# Altium PCB IvcBoard.PcbDoc (part 1 of 3)
Units mil, origin at the board's own origin, x right, y up, seen from the top; angles counter-clockwise.
Board outline 2900 x 5000 mil, 4 copper layers (Top Layer, GND 3, GND 2, Bottom Layer), stack 53.912 mil thick; 217 components, 141 nets, 662 pads, 224 vias.
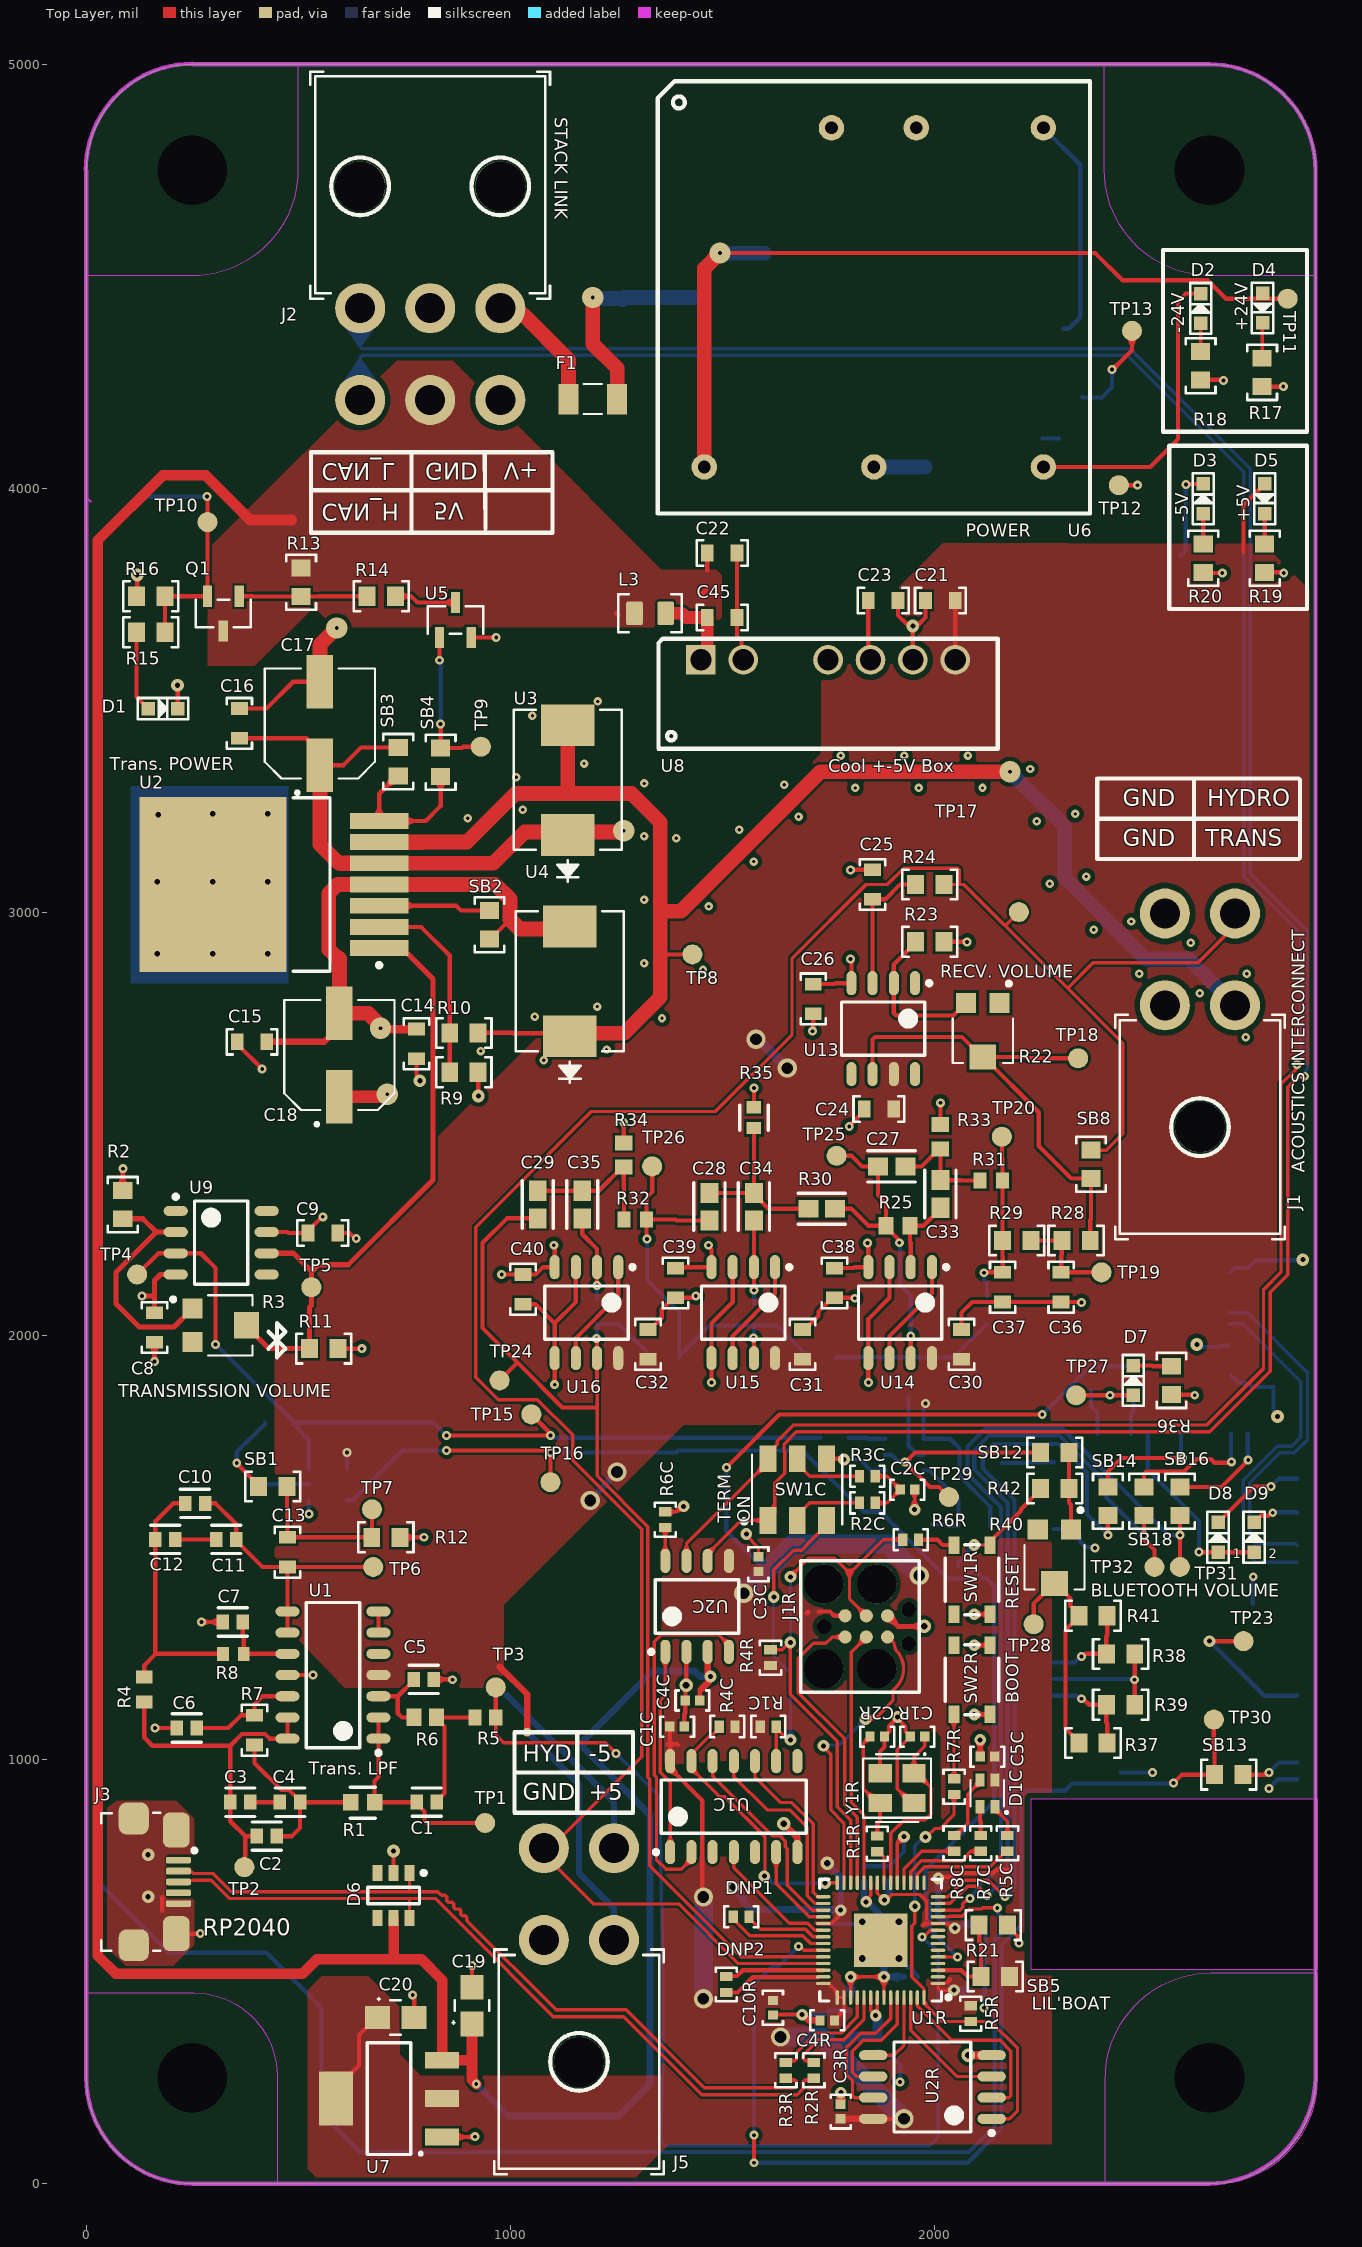
[diagram p0: Top Layer view]
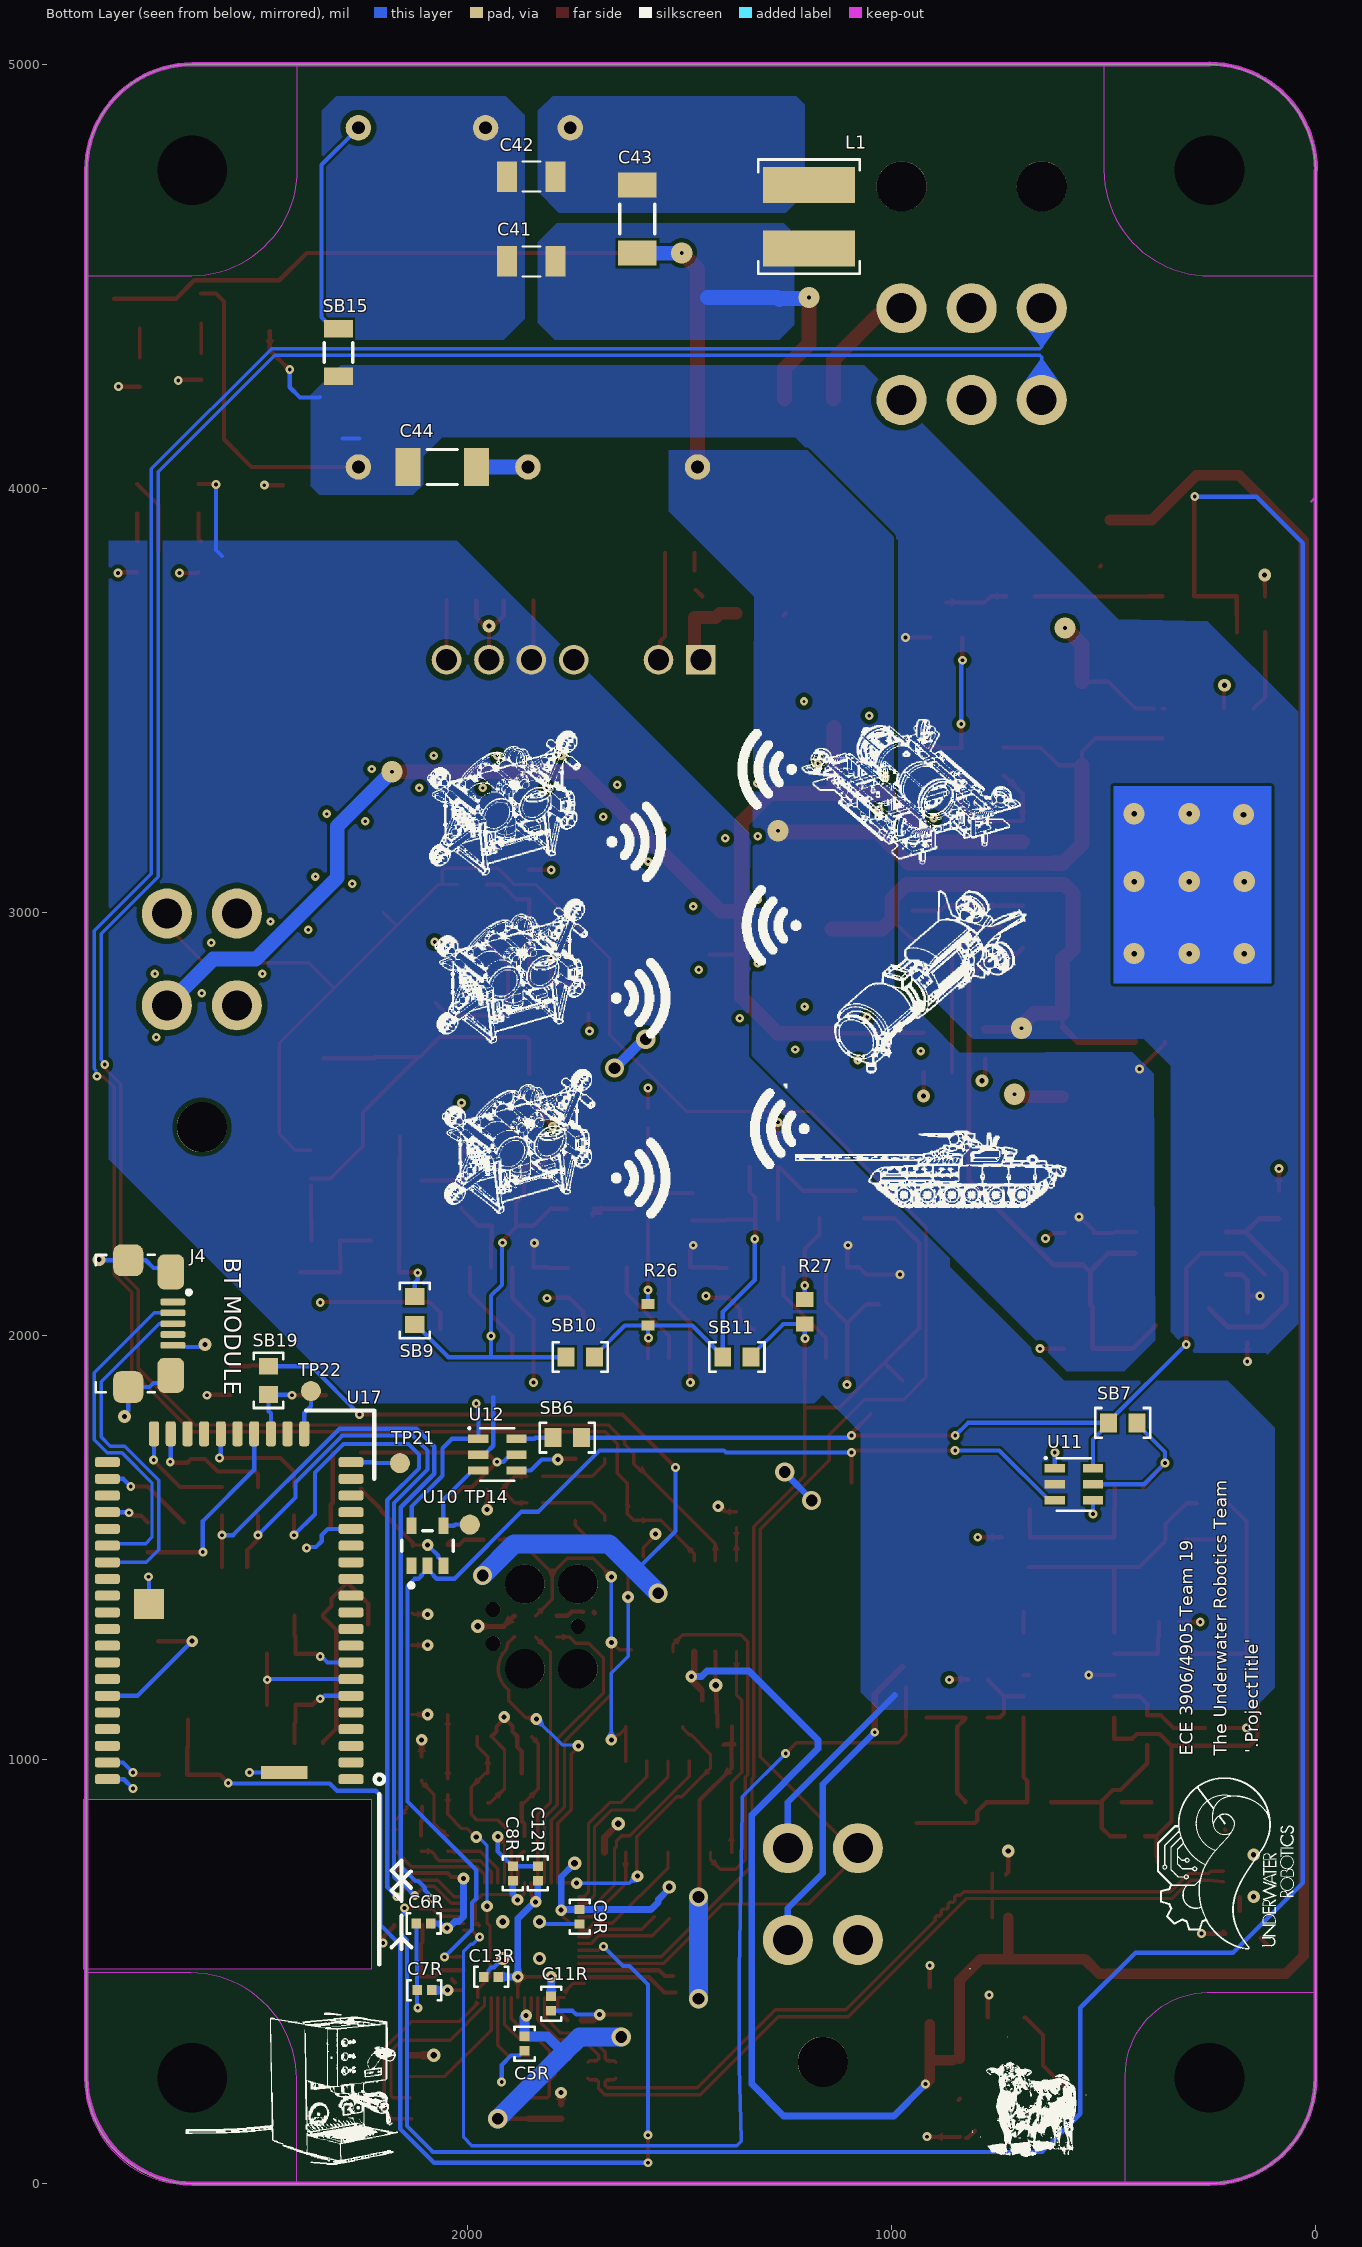
[diagram p1: Bottom Layer view, seen from below]
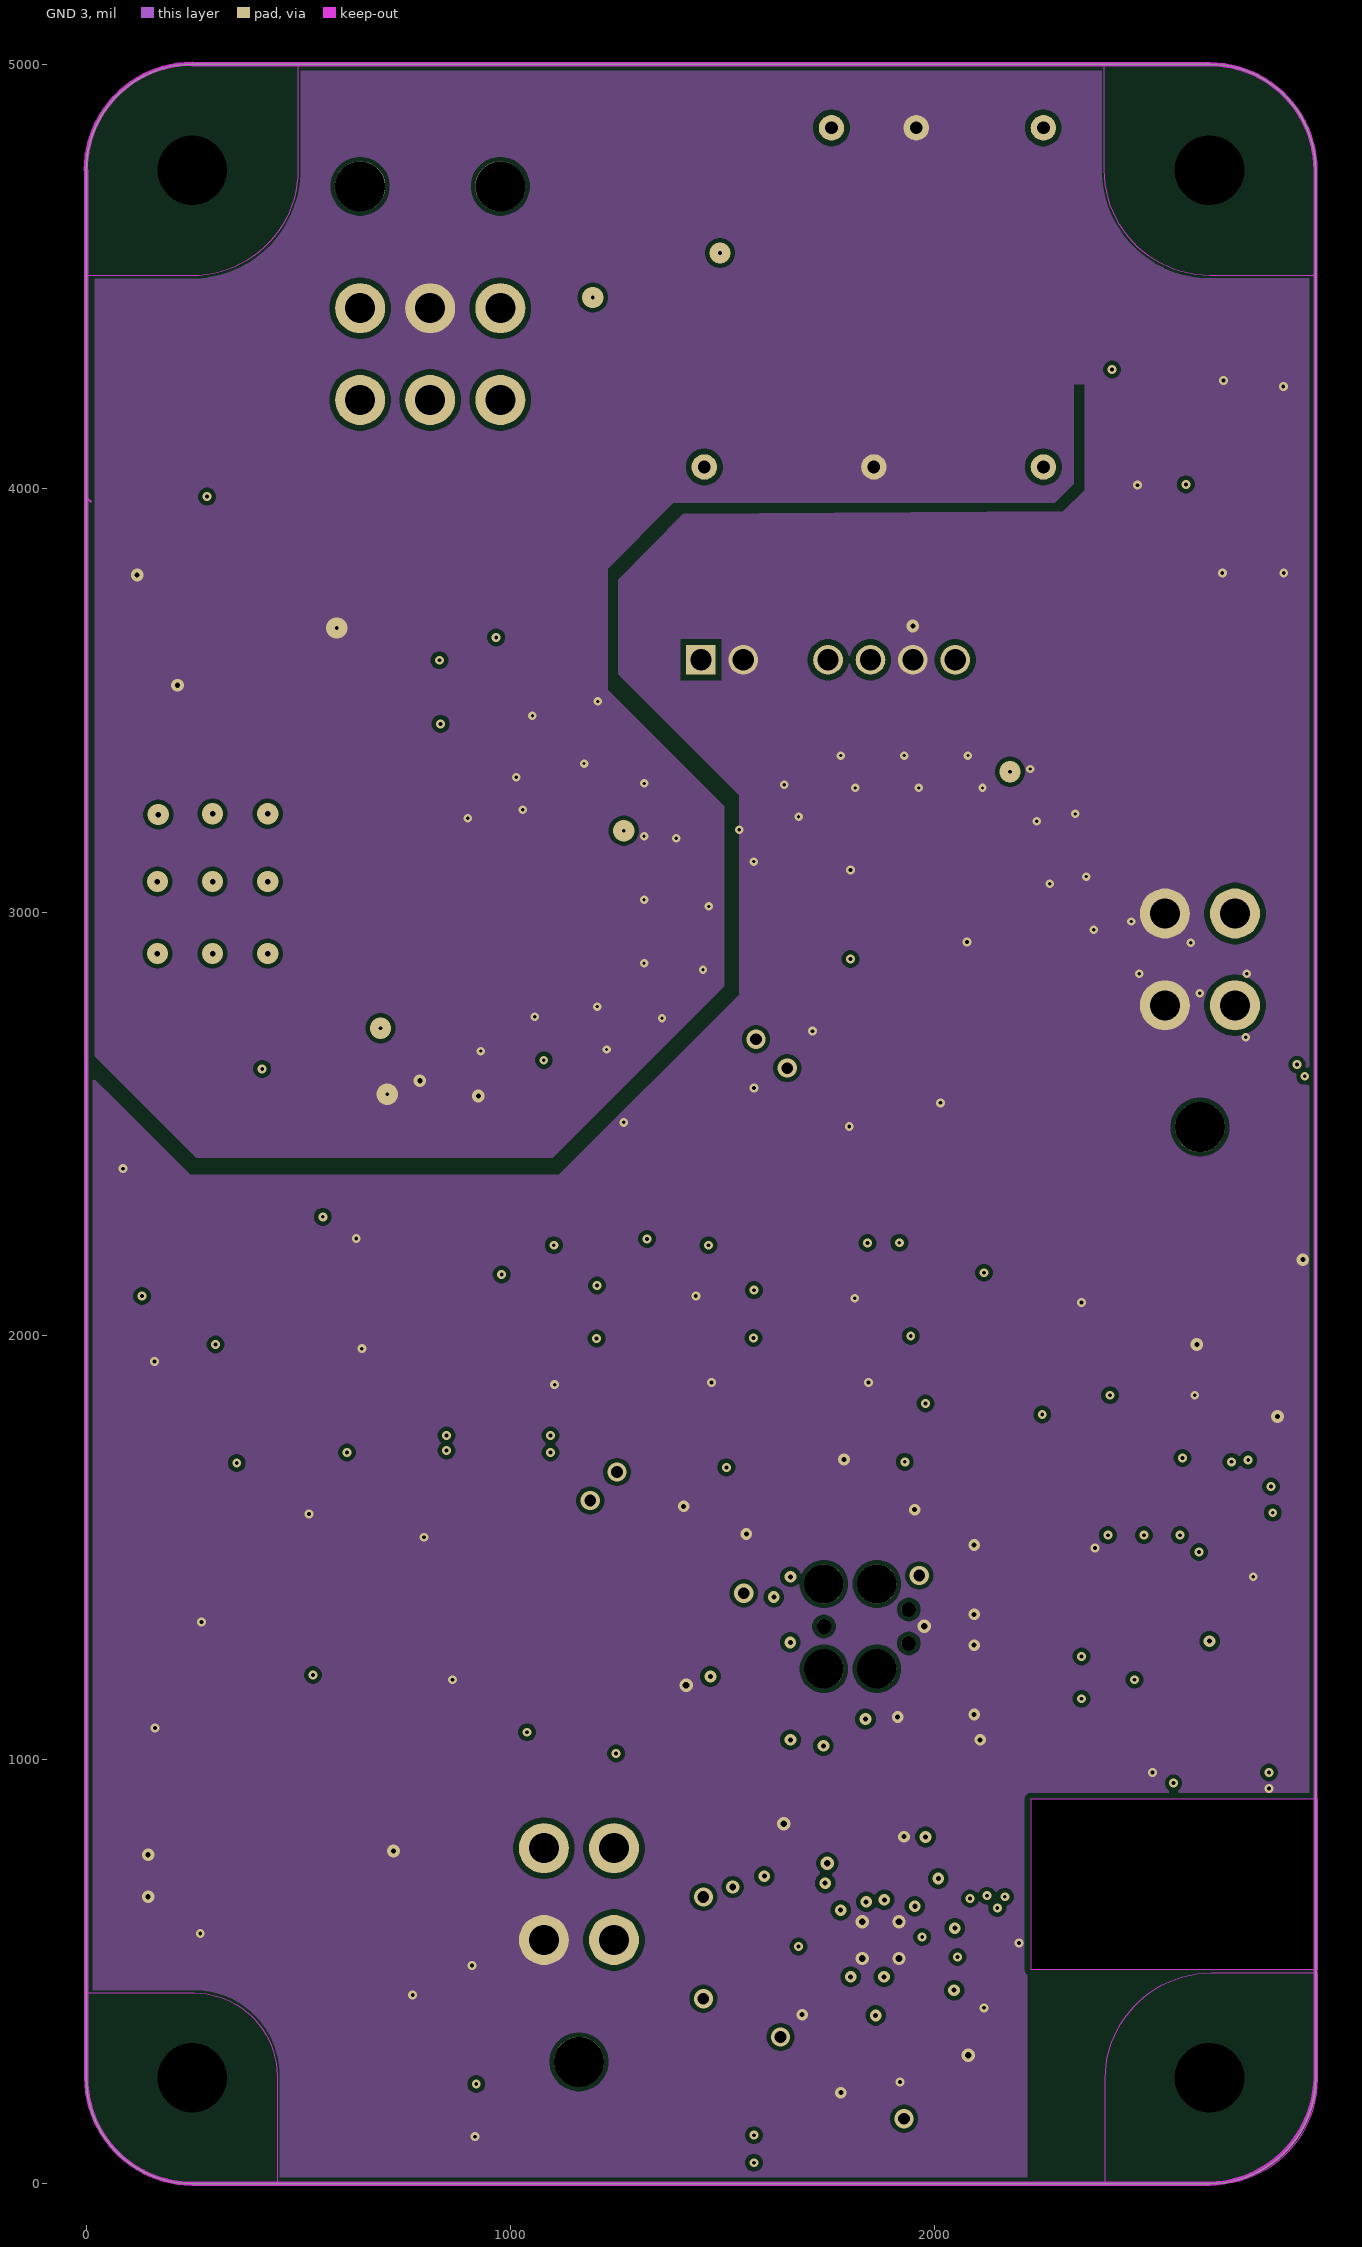
[diagram p2: GND 3]
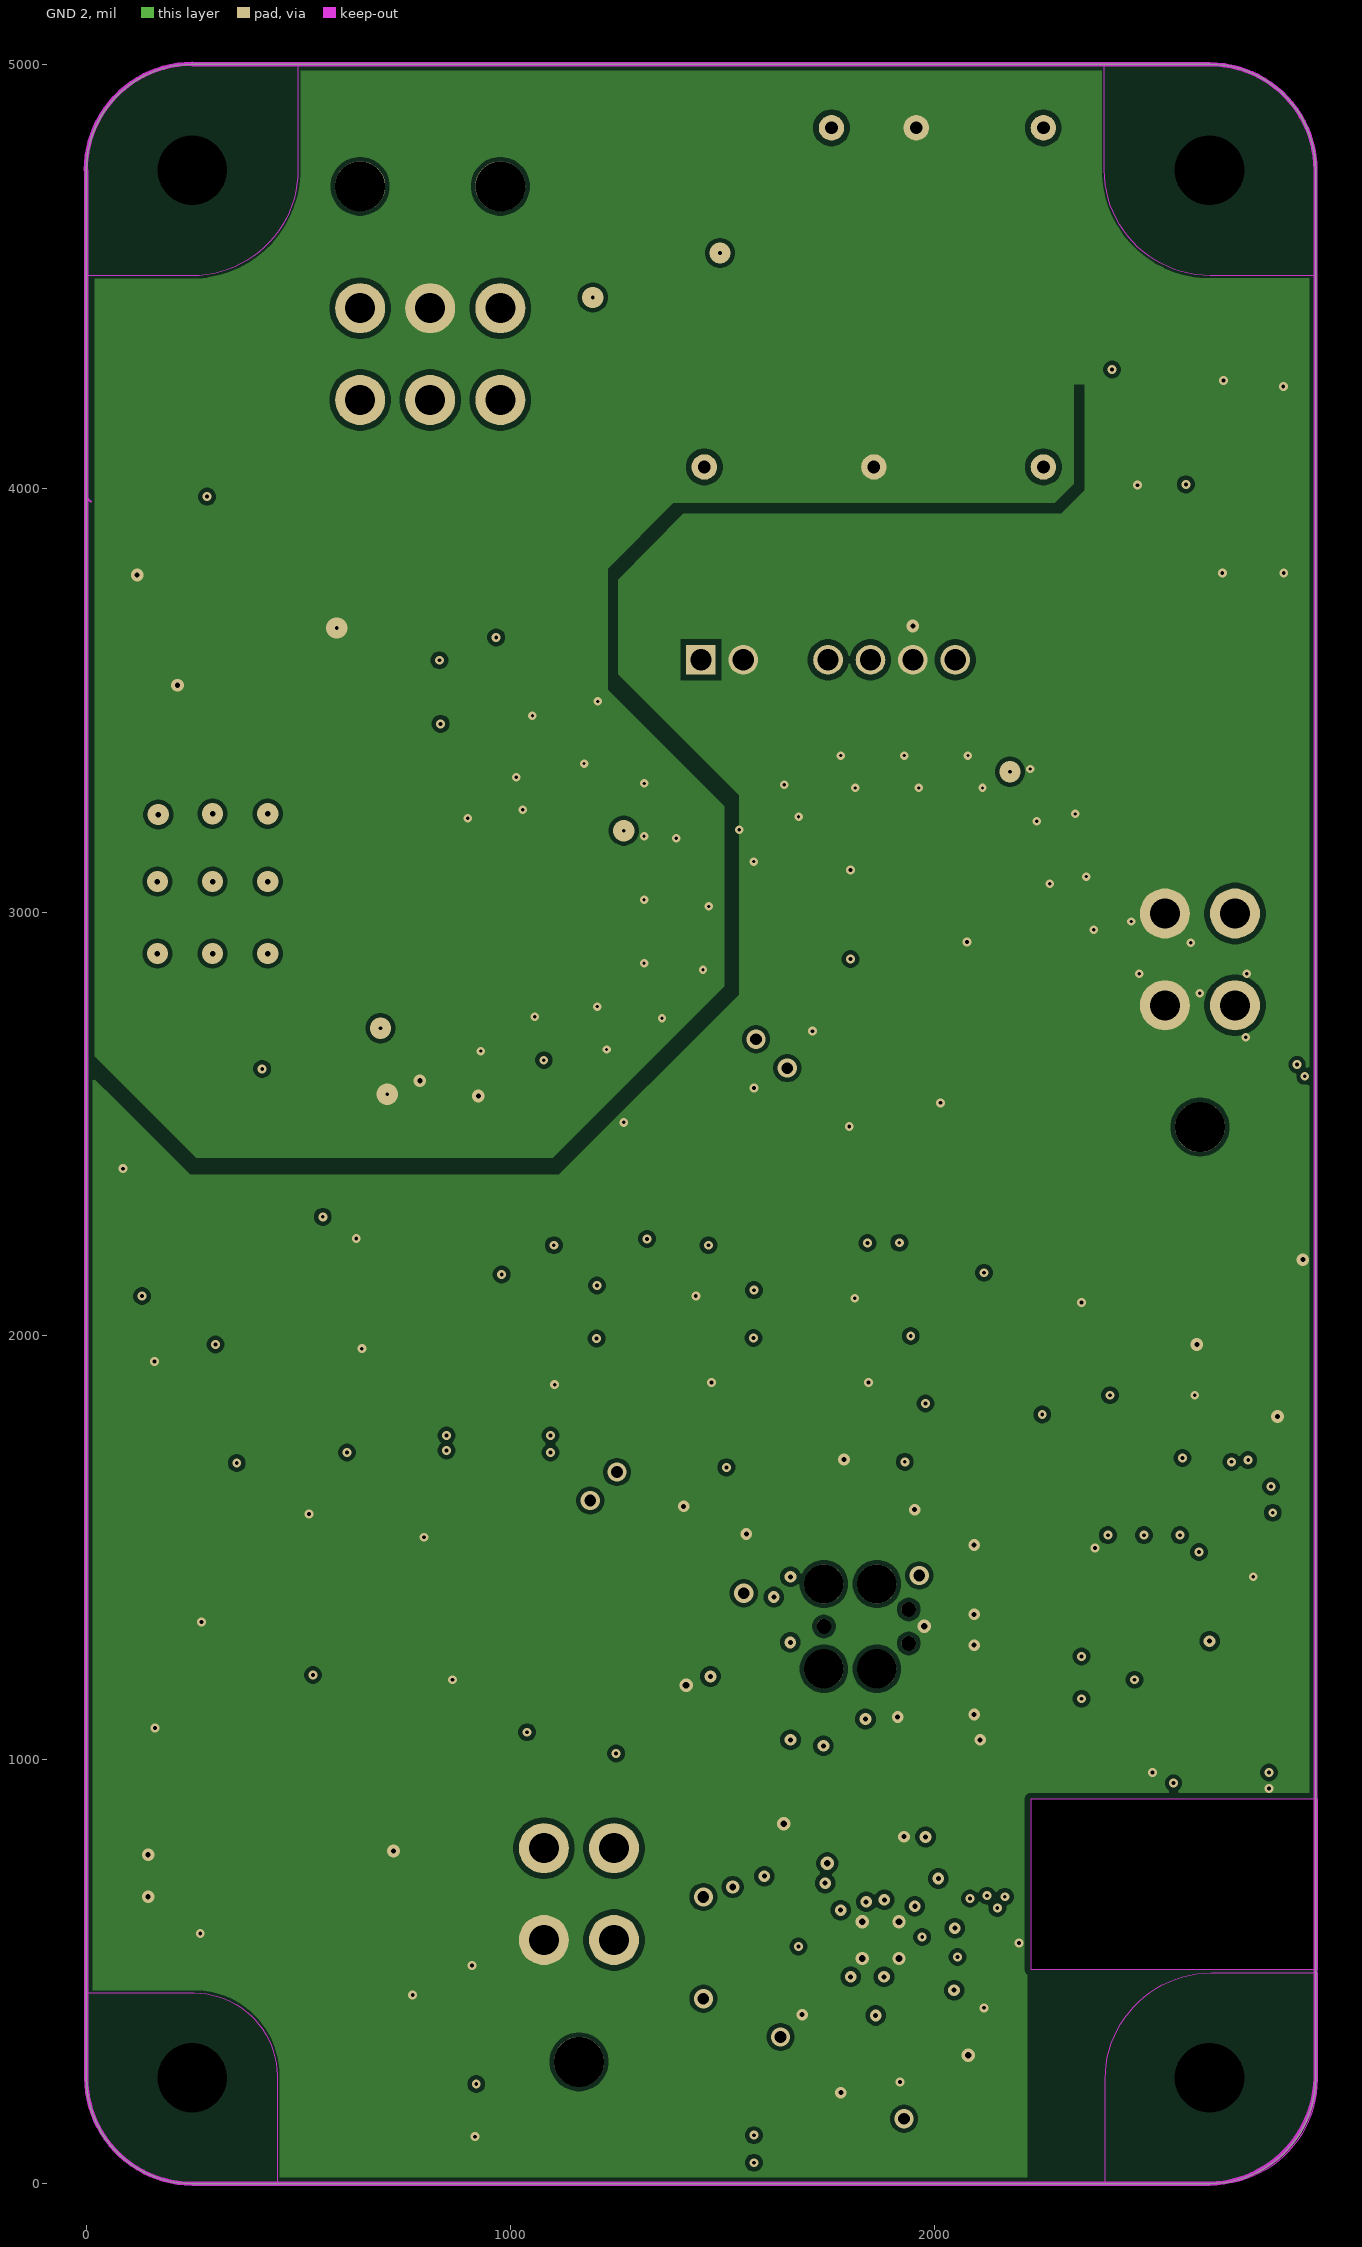
[diagram p3: GND 2]
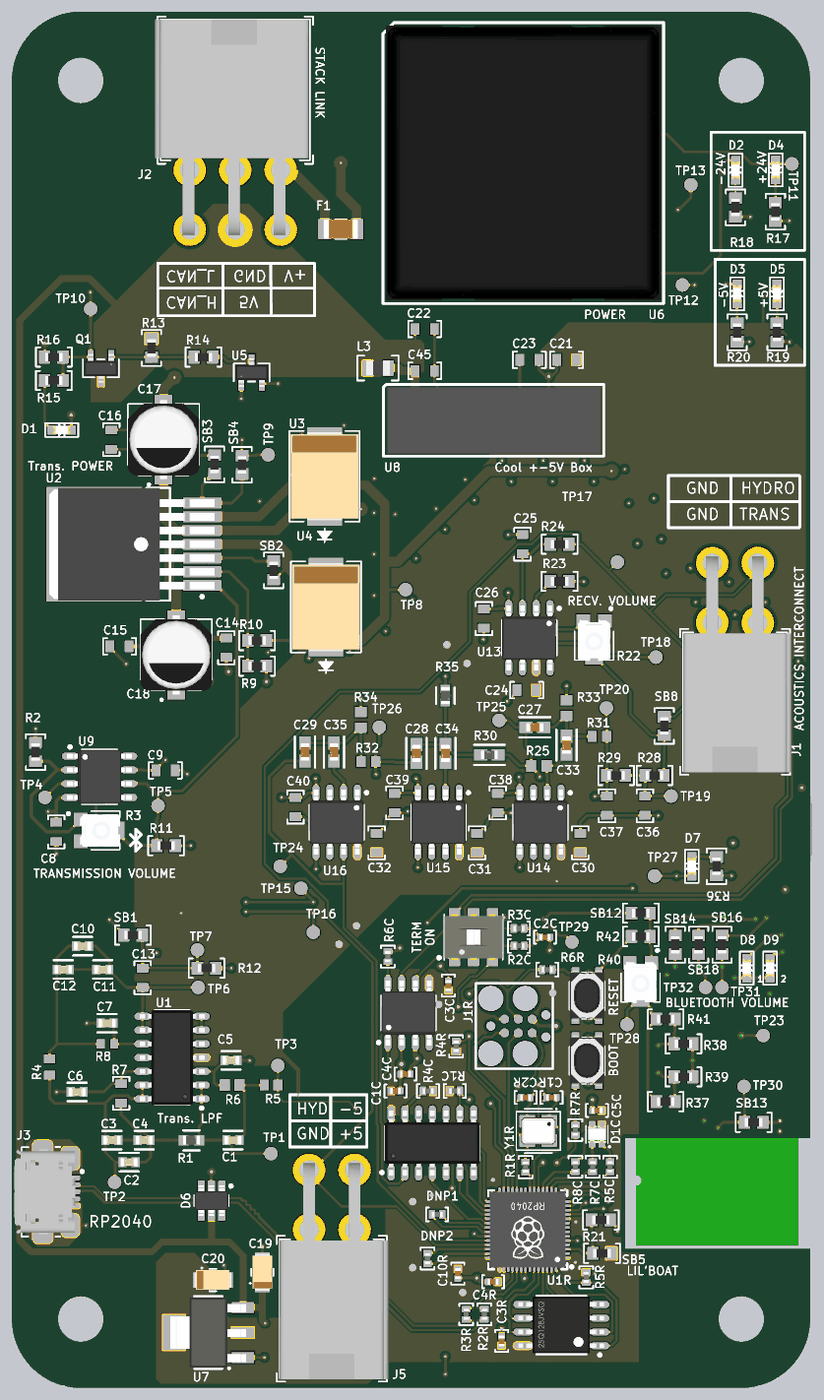
[diagram p6: 3D render of the assembled board from above, using the file's embedded part models]
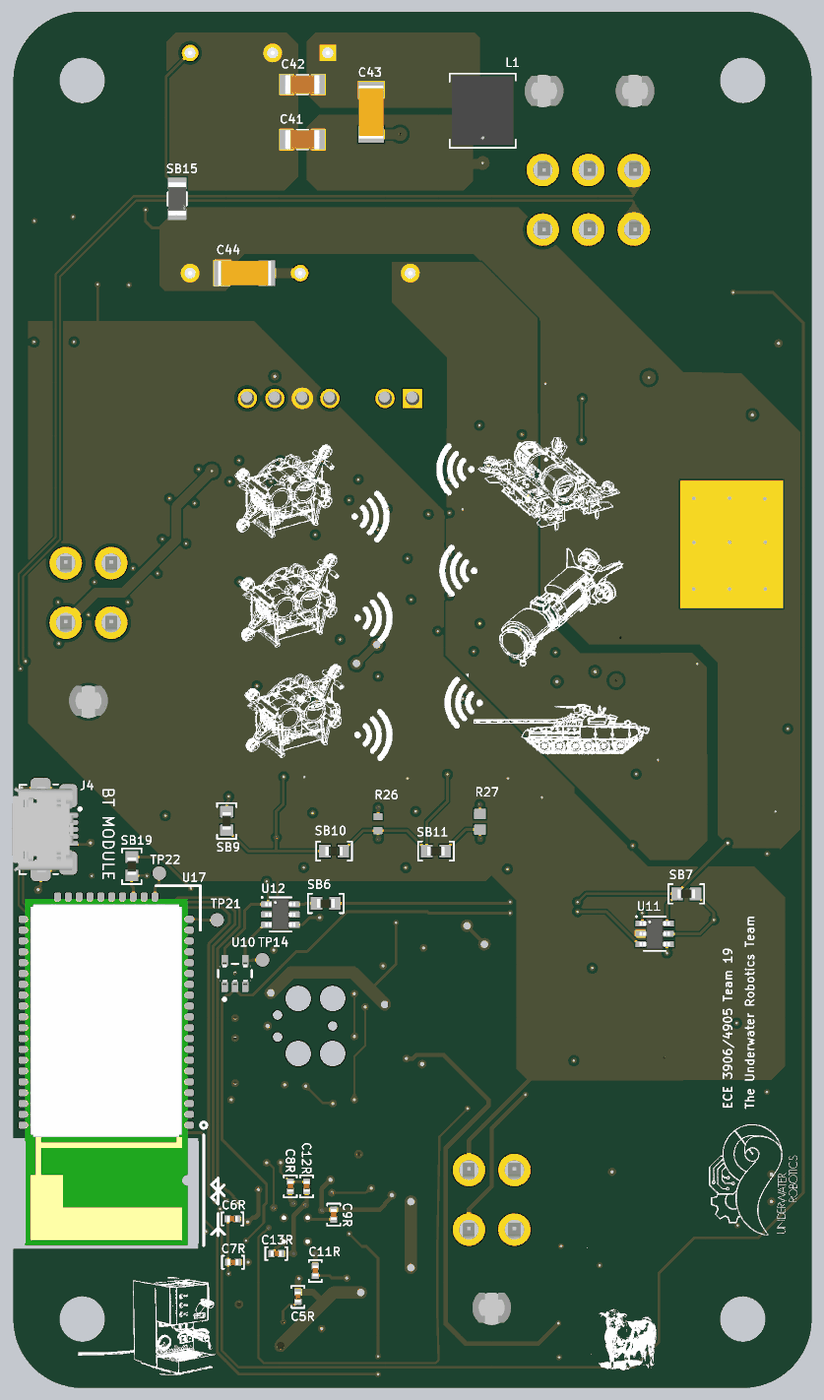
[diagram p7: 3D render of the assembled board from below, using the file's embedded part models]

## Layer stack, top to bottom
Top Solder: solder mask 1, SM-001, Dk 4
Top Layer: signal copper 1.378
Dielectric 1: prepreg 5.1, PP-017, Dk 4.3
Dielectric 2: prepreg 5.1, PP-017, Dk 4.3
GND 3: signal copper 1.378
Dielectric 3: core 28, Core-039, Dk 4.8
GND 2: signal copper 1.378
Dielectric 4: prepreg 5.1, PP-017, Dk 4.3
Dielectric 5: prepreg 5.1, PP-017, Dk 4.3
Bottom Layer: signal copper 1.378
Bottom Solder: solder mask 1, SM-001, Dk 4

## Board outline
0,250 0,4750 cw(c250,4750) 250,5000 2650,5000 cw(c2650,4750) 2900,4750 2900,250 cw(c2650,250) 2650,0 250,0 cw(c250,250)

## Design rules (kind name [scope] priority, off if disabled: settings)
AcuteAngle [All] p1: minimum=6.00000000000000E+0001 checktracksonly=FALSE
BoardOutlineClearance [All] p1: gap=15 ignorepadtopadclearanceinfootprint=FALSE
Clearance "Clearance JLCPCB" [All] p1: gap=6 ignorepadtopadclearanceinfootprint=FALSE except(5: SMDPad-SMDPad; 10: Arc-Via Arc-Hole Track-Via Track-Hole Via-Via Via-Fill Via-Poly Via-Region Fill-Hole Poly-Hole Region-Hole; 13: Arc-THPad Track-THPad THPad-Fill THPad-Poly THPad-Region; 20: THPad-THPad)
ComponentOrientations [All] p1: allowedrotations=32
DiffPairsRouting CAN [All] p1: maxlimit=10 minlimit=8 mostfreqgap=10 toplayer_maxgap=8 toplayer_prefgap=8 toplayer_minwidth=8 toplayer_maxwidth=8 toplayer_prefwidth=8 midlayer1_minwidth=15 midlayer1_maxwidth=15 midlayer1_prefwidth=15 midlayer2_minwidth=15 midlayer2_maxwidth=15 midlayer2_prefwidth=15 bottomlayer_maxgap=8 bottomlayer_prefgap=8 bottomlayer_minwidth=8 bottomlayer_maxwidth=8 bottomlayer_prefwidth=8 impedanceprofiledriven=TRUE maxuncoupledlength=500
DiffPairsRouting "USB 2.0" [InDifferentialPairClass('USB 2.0')] p2: maxlimit=6 minlimit=6 mostfreqgap=6 toplayer_minwidth=15 toplayer_maxwidth=15 toplayer_prefwidth=15 midlayer1_minwidth=2.53 midlayer1_maxwidth=2.53 midlayer1_prefwidth=2.53 midlayer2_minwidth=2.53 midlayer2_maxwidth=2.53 midlayer2_prefwidth=2.53 bottomlayer_minwidth=15 bottomlayer_maxwidth=15 bottomlayer_prefwidth=15 maxuncoupledlength=500
DiffPairsRouting ETH [All] p3 off: maxlimit=10 minlimit=4 mostfreqgap=10 toplayer_maxgap=4 toplayer_prefgap=4 toplayer_minwidth=8 toplayer_maxwidth=8 toplayer_prefwidth=8 midlayer1_minwidth=15 midlayer1_maxwidth=15 midlayer1_prefwidth=15 midlayer2_minwidth=15 midlayer2_maxwidth=15 midlayer2_prefwidth=15 bottomlayer_maxgap=4 bottomlayer_prefgap=4 bottomlayer_minwidth=8 bottomlayer_maxwidth=8 bottomlayer_prefwidth=8 impedanceprofiledriven=TRUE maxuncoupledlength=500
FanoutControl Fanout_Default [All] p5: bgadir=Out bgaviamode=Centered fanoutstyle=Auto fanoutdirection=OutOnly viagrid=1 // Fanout_Default (Default Rule)
HoleSize "HoleSize JLCPCB" [All] p1: absolutevalues=TRUE maxlimit=245 minlimit=8 maxpercent=80.000 minpercent=20.000
HoleToHoleClearance "HoleToHoleClearance JLCPCB" [All] p1: gap=20 allowstackedmicrovias=TRUE
MinimumAnnularRing "MinimumAnnularRing JLCPCB" [All] p1: minimumring=6
MinimumSolderMaskSliver "MinimumSolderMaskSliver JLCPCB" [All] p1: minsoldermaskwidth=1
PasteMaskExpansion [All] p1: expansion=1
PlaneConnect [All] p1: planeconnectstyle=Direct reliefexpansion=20 reliefentries=4 reliefconductorwidth=10 reliefairgap=10
PolygonConnect [All] p1: connectstyle=Direct reliefconductorwidth=10 reliefentries=4 polygonreliefangle="90 Angle" airgapwidth=10
RoutingLayers [All] p1: top layer_v5=TRUE mid layer 1_v5=FALSE mid layer 2_v5=FALSE bottom layer_v5=TRUE
RoutingVias "RoutingVias JLCPCB" [All] p1: holewidth=10 width=22 viastyle="Through Hole" minholewidth=8 minwidth=20 maxholewidth=28 maxwidth=40
SMDEntry [All] p1: side=TRUE corner=TRUE anyangle=TRUE
SMDToCorner [All] p1: distance=0
SMDToPlane [All] p1: distance=0
SilkToSilkClearance "SilkToSilkClearance JLCPCB" [All] p1: silktosilkclearance=3
SilkToSolderMaskClearance "SilkToSolderMaskClearance JLCPCB" [IsPad] p1: minsilkscreentomaskgap=6 clearancetoexposedcopper=TRUE
SolderMaskExpansion [All] p1: expansion=4 istentingtop=FALSE
SupplyNets "Schematic Supply Nets_9" [InNet('3V3_BT')] p1: voltage=0.000
SupplyNets "Schematic Supply Nets_8" [InNet('+5')] p2: voltage=0.000
SupplyNets "Schematic Supply Nets" [InNet('-24')] p3: voltage=0.000
SupplyNets "Schematic Supply Nets_4" [InNet('3v3')] p4: voltage=0.000
SupplyNets "Schematic Supply Nets_2" [InNet('5V')] p5: voltage=0.000
SupplyNets "Schematic Supply Nets_6" [InNet('-5')] p6: voltage=0.000
SupplyNets "Schematic Supply Nets_5" [InNet('+24')] p7: voltage=0.000
SupplyNets "Schematic Supply Nets_3" [InNet('GND')] p8: voltage=0.000
SupplyNets "Schematic Supply Nets_1" [InNet('V+')] p9: voltage=0.000
UnRoutedNet [All] p1: checkbadconnections=TRUE
Width "Width JLCPCB" [All] p1: maxlimit=100 minlimit=6 preferedwidth=10
19 further rules are at their usual default settings.

## Classes and differential pairs
component class U_Receiving: C24 C25 C26 C27 C28 C29 C30 C31 C32 C33 C34 C35 C36 C37 C38 C39 C40 R22 R23 R24 R25 R26 R27 R28 R29 R30 R31 R32 R33 R34 R35 SB8 SB9 SB10 SB11 TP17 TP18 TP19 TP20 TP24 TP25 TP26 U13 U14 U15 U16
component class U_Bluetooth: D7 D8 D9 J4 R36 R37 R38 R39 R40 R41 R42 SB12 SB13 SB14 SB16 SB18 TP21 TP22 TP23 TP27 TP28 TP29 TP30 TP31 TP32 U17
component class U_Transmission: C1 C2 C3 C4 C5 C6 C7 C8 C9 C10 C11 C12 C13 C14 C15 C16 C17 C18 D1 Q1 R1 R2 R3 R4 R5 R6 R7 R8 R9 R10 R11 R12 R13 R14 R15 R16 SB1 SB2 SB3 SB4 SB6 SB7 TP1 TP2 TP3 TP4 TP5 TP6 TP7 TP8 TP9 TP10 TP14 TP15 TP16 U1 U2 U3 U4 U5 U9 U10 U11 U12
differential pair class "USB 2.0": USB USB_RP2040
component class U_RP2040_with_CAN: C1C C2C C3C C4C C5C D1C R1C R2C R3C R4C R5C R6C R7C R8C SW1C U1C U2C
component class U_RP2040_C: C1R C2R C3R C4R C5R C6R C7R C8R C9R C10R C11R C12R C13R J1R R1R R2R R3R R4R R5R R6R R7R SW1R SW2R U1R U2R Y1R
component class PowerAndConnections: C19 C20 C21 C22 C23 C41 C42 C43 C44 C45 D2 D3 D4 D5 D6 DNP1 DNP2 F1 J1 J2 J3 J5 L1 L3 R17 R18 R19 R20 R21 SB5 SB15 SB19 TP11 TP12 TP13 U6 U7 U8
differential pair BM83_USB: +BM83_USB_P -BM83_USB_N
differential pair CAN: +CAN_P -CAN_N
differential pair USB: +USB_P -USB_N
differential pair USB_RP2040: +USB_RP2040_P -USB_RP2040_N

## Components (designator, comment, footprint, x,y, rotation, side; value= is the part's Value field where it differs from the comment)
C1 "1n" FP-C0603C-CF-MFG 803,900 r180 top value="1,000 pF"
C1C "100nF Ceramic 25V" CAPACITOR_0402 1393.7,1078.54 r0 top value=0.1uF
C1R "27pF Ceramic 50V" CAPACITOR_0402 1960.63,1054.92 r180 top value=27pF
C2 "1n" FP-C0603C-CF-MFG 425.62,820 r0 top value="1,000 pF"
C2C "4700pF Ceramic 25V" CAPACITOR_0402 1937.01,1637.6 r180 top value=4.7nF
C2R "27pF Ceramic 50V" CAPACITOR_0402 1866.14,1054.92 r0 top value=27pF
C3 "1n" FP-C0603C-CF-MFG 363.38,900 r0 top value="1,000 pF"
C3C "100nF Ceramic 25V" CAPACITOR_0402 1585.83,1461.57 r90 top value=0.1uF
C3R "100nF Ceramic 6.3V" CAPACITOR_0402 1779.53,170.28 r90 top value=0.1uF
C4 "1n" FP-C0603C-CF-MFG 480.62,900 r0 top value="1,000 pF"
C4C "100nF Ceramic 25V" CAPACITOR_0402 1430,1140 r180 top value=0.1uF
C4R "1uF Ceramic 16V" CAPACITOR_0402 1748.03,385.63 r180 top value=1uF
C5 "1n" FP-C0603C-CF-MFG 795.62,1190 r0 top value="1,000 pF"
C5C "1uF Ceramic 16V" CAPACITOR_0402 2125.98,1007.68 r180 top value=1uF
C5R "100nF Ceramic 6.3V" CAPACITOR_0402 1866.14,330.51 r270 bottom value=0.1uF
C6 "1n" FP-C0603C-CF-MFG 237,1075 r180 top value="1,000 pF"
C6R "100nF Ceramic 6.3V" CAPACITOR_0402 2104.11,613.98 r0 bottom value=0.1uF
C7 "1n" FP-C0603C-CF-MFG 345.62,1325 r180 top value="1,000 pF"
C7R "100nF Ceramic 6.3V" CAPACITOR_0402 2102.36,456.5 r0 bottom value=0.1uF
C8 "100nF Ceramic 25V" CAPACITOR_0603 161,2020 r270 top value=0.1uF
C8R "100nF Ceramic 6.3V" CAPACITOR_0402 1893.81,732.09 r90 bottom value=0.1uF
C9 "100nF Ceramic 25V" CAPACITOR_0603 558,2243 r0 top value=0.1uF
C9R "100nF Ceramic 6.3V" CAPACITOR_0402 1736.22,629.72 r270 bottom value=0.1uF
C10 "1n" FP-C0603C-CF-MFG 256.61,1605.09 r180 top value="1,000 pF"
C10R "100nF Ceramic 6.3V" CAPACITOR_0402 1620,415 r270 top value=0.1uF
C11 "1n" FP-C0603C-CF-MFG 330.23,1520.09 r180 top value="1,000 pF"
C11R "1uF Ceramic 16V" CAPACITOR_0402 1803.15,425 r270 bottom value=1uF
C12 "1n" FP-C0603C-CF-MFG 186.61,1520.09 r180 top value="1,000 pF"
C12R "100nF Ceramic 6.3V" CAPACITOR_0402 1834.65,732.09 r90 bottom value=0.1uF
C13 "1uF Ceramic 16V" CAPACITOR_0603 475,1490 r270 top value=1uF
C13R "100nF Ceramic 6.3V" CAPACITOR_0402 1944.88,487.99 r0 bottom value=0.1uF
C14 "100nF Ceramic 25V" CAPACITOR_0603 779,2689 r270 top value=0.1uF
C15 "CL10B103KB8NNNC" CAPACITOR_0603 391,2694 r180 top value=0.01uF
C16 "100nF Ceramic 25V" CAPACITOR_0603 361,3445 r90 top value=0.1uF
C17 "10uF electrolytic 63V" CAP_EEHZC1J100P 551,3445 r90 top value=10uF
C18 "10uF electrolytic 63V" CAP_EEHZC1J100P 597,2663 r90 top value=10uF
C19 "10uF Tantalum 16V" "CAPACITOR_1206 - POLAR" 910,420 r90 top
C20 "10uF Tantalum 16V" "CAPACITOR_1206 - POLAR" 730,392 r0 top
C21 "CL10X106MO8NRNC" CAPACITOR_0603 2015,3735 r180 top value=10uF
C22 "4.7uF Ceramic 6.3V" CAPACITOR_0603 1500,3847 r0 top value=4.7uF
C23 "CL10X106MO8NRNC" CAPACITOR_0603 1880,3735 r180 top value=10uF
C24 "100nF Ceramic 6.3V" CAPACITOR_0603 1870,2535 r180 top value=0.1uF
C25 "100nF Ceramic 6.3V" CAPACITOR_0603 1855,3065 r90 top value=0.1uF
C26 "100nF Ceramic 6.3V" CAPACITOR_0603 1715,2795 r270 top value=0.1uF
C27 "1n" FP-0603-L_1_6_0_15-W_0_81-IPC_A 1900,2400 r180 top
C28 "1n" FP-0603-L_1_6_0_15-W_0_81-IPC_A 1470,2305 r270 top
C29 "1n" FP-0603-L_1_6_0_15-W_0_81-IPC_A 1065,2310 r270 top
C30 "100nF Ceramic 6.3V" CAPACITOR_0603 2065,1980 r90 top value=0.1uF
C31 "100nF Ceramic 6.3V" CAPACITOR_0603 1690,1980 r90 top value=0.1uF
C32 "100nF Ceramic 6.3V" CAPACITOR_0603 1325,1980 r90 top value=0.1uF
C33 "1n" FP-0603-L_1_6_0_15-W_0_81-IPC_A 2015,2335 r270 top
C34 "1n" FP-0603-L_1_6_0_15-W_0_81-IPC_A 1575,2305 r270 top
C35 "1n" FP-0603-L_1_6_0_15-W_0_81-IPC_A 1170,2310 r270 top
C36 "100nF Ceramic 6.3V" CAPACITOR_0603 2300,2115 r270 top value=0.1uF
C37 "100nF Ceramic 6.3V" CAPACITOR_0603 2162,2115 r270 top value=0.1uF
C38 "100nF Ceramic 6.3V" CAPACITOR_0603 1765,2125 r270 top value=0.1uF
C39 "100nF Ceramic 6.3V" CAPACITOR_0603 1390,2125 r270 top value=0.1uF
C40 "100nF Ceramic 6.3V" CAPACITOR_0603 1030,2110 r270 top value=0.1uF
C41 "AGC1206X7R500-475KXE*" CAPACITOR_1206 1850,4535 r0 bottom value=4.7uF
C42 "AGC1206X7R500-475KXE*" CAPACITOR_1206 1850,4735 r0 bottom value=4.7uF
C43 "CC1808KKX7REBB681" CAPACITOR_1808 1600,4635 r270 bottom value=680pF
C44 "CC1808KKX7REBB681" CAPACITOR_1808 2060,4050 r180 bottom value=680pF
C45 "4.7uF Ceramic 6.3V" CAPACITOR_0603 1500,3695 r0 top value=4.7uF
D1 "150060RS75000" LED_0603 181,3480 r0 top
D1C "EAST1616RGBB4" LED_0606_4SMD 2125.98,921.06 r90 top
D2 "150060GS75000" LED_0603 2629,4424 r90 top
D3 "150060GS75000" LED_0603 2635,3975 r90 top
D4 "150060GS75000" LED_0603 2775,4425 r270 top
D5 "150060GS75000" LED_0603 2780,3975 r270 top
D6 "TVS DIODE 5VWM 25VC SOT23-6" "SOT 23-6L" 725,680 r270 top
D7 "150060GS75000" LED_0603 2470,1895 r90 top
D8 "150060YS75000" LED_0603 2670,1525 r90 top
D9 "150060YS75000" LED_0603 2755,1525 r90 top
DNP1 "DNP" RESISTOR_0402 1545,630 r180 top
DNP2 "DNP" RESISTOR_0402 1510,470 r270 top
F1 "0685T1500-01" CAPACITOR_1206 1195,4210 r0 top
J1 "Mini-Fit Jr R/A" "CONN_MOLEX_MINIFIT JR_4 POS_R/A" 2627.32,2492.6 r0 top
J1R "TagConnect SWD" TC2030-MCP 1740.16,1314.76 r0 top
J2 "Mini-Fit Jr R/A" "CONN_MOLEX_MINIFIT JR_6 POS_R/A" 976.71,4712 r180 top
J3 "USB_MICRO R/A" CONN_MINIUSB 112,712 r270 top
J4 "USB_MICRO R/A" CONN_MINIUSB 2801,2029 r270 bottom
J5 "Mini-Fit Jr R/A" "CONN_MOLEX_MINIFIT JR_4 POS_R/A" 1162.32,287.6 r0 top
L1 "TCK-078" INDUCTOR_TCK078 1195,4565.39 r90 bottom value=1.1uH
L3 "MLZ2012N6R8LT000" INDUCTOR_0805 1330,3705 r0 top value=6.8uH
Q1 "PNP 60V 600mA SOT23" SOT-23-3 323.5,3704 r180 top
R1 "2.55K" FP-CRCW0603-e3-IPC_B 652,900 r0 top
R1C "10k Ohm 1% 1/16W" RESISTOR_0402 1608.86,1078.54 r0 top
R1R "1k Ohm 1% 1/16W" RESISTOR_0402 1866.14,801.89 r90 top
R2 "4.7k Ohm 5% 1/10W" RESISTOR_0603 86,2310 r90 top
R2C "60.4 Ohm 1% 1/16W" RESISTOR_0402 1842.52,1606.1 r0 top
R2R "27 Ohm 1% 1/16W" RESISTOR_0402 1716.54,267.52 r90 top
R3 "TC33X-2-203E" TRIM_TC33X-2-203E 321,2025 r0 top
R3C "60.4 Ohm 1% 1/16W" RESISTOR_0402 1842.52,1669.09 r0 top
R3R "27 Ohm 1% 1/16W" RESISTOR_0402 1650.53,267.52 r90 top
R4 "1.5K" RESC1608X55X25ML10T15 137,1166 r90 top
R4C "10k Ohm 1% 1/16W" RESISTOR_0402 1511.81,1078.54 r180 top
R4R "10k Ohm 1% 1/16W" RESISTOR_0402 1614.17,1240.94 r90 top
R5 "3.57K" RESC1609X50X30NL10T20 941.61,1100 r180 top
R5C "604 Ohm 1% 1/16W" RESISTOR_0402 2173.23,802.95 r90 top
R5R "10k Ohm 1% 1/16W" RESISTOR_0402 2086.61,401.38 r270 top
R6 "4.22K" RESC1609X50X30ML10T20 800,1100 r180 top
R6C "10k Ohm 1% 1/16W" RESISTOR_0402 1365.94,1566.73 r90 top
R6R "1k Ohm 1% 1/16W" RESISTOR_0402 1944.88,1519.49 r180 top
R7 "3.57K" CAPACITOR_0603 397,1070 r90 top
R7C "200 Ohm 1% 1/16W" RESISTOR_0402 2110.24,802.95 r90 top
R7R "1k Ohm 1% 1/16W" RESISTOR_0402 2047.24,936.81 r270 top
R8 "1.78K" RESC1608X55X30LL15T15 347,1250 r180 top
R8C "200 Ohm 1% 1/16W" RESISTOR_0402 2047.24,802.95 r90 top
R9 "1k Ohm 5% 1/8W" RESISTOR_0603 891,2622 r0 top
R10 "3.9k Ohm 5% 1/10W" RESISTOR_0603 891,2715 r180 top
R11 "1k Ohm 5% 1/8W" RESISTOR_0603 560,1970 r180 top
R12 "10k Ohm 5% 1/10W" RESISTOR_0603 707,1525 r0 top
R13 "1k Ohm 5% 1/8W" RESISTOR_0603 507,3778 r270 top
R14 "3.09k Ohm 1% 1/16W" RESISTOR_0603 696,3745 r0 top
R15 "220 Ohm 5% 1/8W" RESISTOR_0603 152,3660 r180 top
R16 "470k Ohm 5% 1/10W" RESISTOR_0603 152.5,3745 r180 top
R17 "1k Ohm 5% 1/8W" RESISTOR_0603 2774,4273 r270 top
R18 "1k Ohm 5% 1/8W" RESISTOR_0603 2629,4289 r270 top
R19 "220 Ohm 5% 1/8W" RESISTOR_0603 2780,3835 r270 top
R20 "220 Ohm 5% 1/8W" RESISTOR_0603 2635,3835 r270 top
R21 "10k Ohm 5% 1/10W" RESISTOR_0603 2140,610 r0 top
R22 "TC33X-2-203E" TRIM_TC33X-2-203E 2115,2715 r270 top
R23 "1k Ohm 5% 1/8W" RESISTOR_0603 1990,2930 r0 top
R24 "RES SMD 240 OHM 5% 1/10W 0603" RESISTOR_0603 1990,3065 r0 top
R25 "ERJ-3EKF1073V" RESC1608X55X30ML15T15 1915,2260 r180 top
R26 "RC0603FR-07255KL" RESC1608X55X25LL10T15 1575,2050 r270 bottom
R27 "ERJ-3EKF1073V" RESC1608X55X30ML15T15 1205,2057 r270 bottom
R28 "RES SMD 240 OHM 5% 1/10W 0603" RESISTOR_0603 2335,2225 r0 top
R29 "RES SMD 240 OHM 5% 1/10W 0603" RESISTOR_0603 2195,2225 r0 top
R30 "RMCF0603FT31K6" FP-RMCF0603-IPC_A 1735,2300 r180 top
R31 "ERJ-3EKF5362V" RESC1608X55X30NL15T15 2135,2367 r180 top
R32 "ERJ-3EKF5362V" RESC1608X55X30NL15T15 1295,2275 r180 top
R33 "ERJ-3EKF7870V" RESC1608X55X30ML15T15 2015,2470 r270 top
R34 "ERJ-3EKF7870V" RESC1608X55X30ML15T15 1268,2427 r270 top
R35 "CRCW0603453RFKEA" FP-CRCW0603-e3-IPC_C 1575,2515 r270 top
R36 "220 Ohm 5% 1/8W" RESISTOR_0603 2560,1895 r270 top
R37 "RN73R1JTTD32R0D25" RESISTOR_0603 2375,1040 r180 top value=32
R38 "RN73R1JTTD32R0D25" RESISTOR_0603 2440,1130 r0 top value=32
R39 "RN73R1JTTD32R0D25" RESISTOR_0603 2440,1250 r0 top value=32
R40 "TC33X-2-203E" TRIM_TC33X-2-203E 2284,1473 r270 top
R41 "RN73R1JTTD32R0D25" RESISTOR_0603 2375,1340 r180 top value=32
R42 "1k Ohm 5% 1/8W" RESISTOR_0603 2285,1640 r180 top
SB1 "0 Ohm Jumper No Fit" RESISTOR_0603 440,1645 r0 top
SB2 "0 Ohm Jumper No Fit" RESISTOR_0603 951,2970 r270 top
SB3 "0 Ohm Jumper No Fit" RESISTOR_0603 736,3355 r90 top
SB4 "0 Ohm Jumper No Fit" RESISTOR_0603 836,3353.5 r90 top
SB5 "0 Ohm Jumper No Fit" RESISTOR_0603 2144,489 r180 top
SB6 "0 Ohm Jumper No Fit" RESISTOR_0603 1765,1760 r0 bottom
SB7 "0 Ohm Jumper No Fit" RESISTOR_0603 455,1795 r180 bottom
SB8 "0 Ohm Jumper No Fit" RESISTOR_0603 2370,2405 r90 top
SB9 "0 Ohm Jumper No Fit" RESISTOR_0603 2125,2060 r90 bottom
SB10 "0 Ohm Jumper No Fit" RESISTOR_0603 1735,1950 r0 bottom
SB11 "0 Ohm Jumper No Fit" RESISTOR_0603 1365,1950 r0 bottom
SB12 "0 Ohm Jumper No Fit" RESISTOR_0603 2285,1725 r180 top
SB13 "0 Ohm Jumper No Fit" RESISTOR_0603 2695,965 r0 top
SB14 "0 Ohm Jumper No Fit" RESISTOR_0603 2410,1610 r270 top
SB15 "JUMPER_0_1206" RESISTOR_1206 2305,4320 r270 bottom value=0
SB16 "0 Ohm Jumper No Fit" RESISTOR_0603 2580,1610 r270 top
SB18 "0 Ohm Jumper No Fit" RESISTOR_0603 2495,1610 r270 top
SB19 "0 Ohm Jumper No Fit" RESISTOR_0603 2470,1895 r90 bottom
SW1C "Switch DPDT" CAS-220TA 1677.17,1637.6 r0 top
SW1R "434123025826" SMD_434123025826 2089.57,1425 r90 top
SW2R "434123025826" SMD_434123025826 2089.57,1188.78 r90 top
TP1 "PCB Test Point" TESTPOINT_1.2MM#1 941,851 r90 top
TP2 "PCB Test Point" TESTPOINT_1.2MM#1 373,747 r90 top
TP3 "PCB Test Point" TESTPOINT_1.2MM#1 966,1171 r90 top
TP4 "PCB Test Point" TESTPOINT_1.2MM#1 120,2145 r90 top
TP5 "PCB Test Point" TESTPOINT_1.2MM#1 531,2115 r90 top
TP6 "PCB Test Point" TESTPOINT_1.2MM#1 677,1455 r90 top
TP7 "PCB Test Point" TESTPOINT_1.2MM#1 674,1591 r90 top
TP8 "PCB Test Point" TESTPOINT_1.2MM#2 1430,2715 r90 top
TP9 "PCB Test Point" TESTPOINT_1.2MM#1 931,3390 r90 top
TP10 "PCB Test Point" TESTPOINT_1.2MM#1 286,3920 r90 top
TP11 "PCB Test Point" TESTPOINT_1.2MM#1 2834,4447 r90 top
TP12 "PCB Test Point" TESTPOINT_1.2MM#1 2436,4007 r90 top
TP13 "PCB Test Point" TESTPOINT_1.2MM#1 2467,4371 r90 top
TP14 "PCB Test Point" TESTPOINT_1.2MM#3 1995,1555 r0 top
TP15 "PCB Test Point" TESTPOINT_1.2MM#1 1050,1815 r0 top
TP16 "PCB Test Point" TESTPOINT_1.2MM#1 1095,1655 r0 top
TP17 "PCB Test Point" TESTPOINT_1.2MM#4 2025,3170 r0 top
TP18 "PCB Test Point" TESTPOINT_1.2MM#1 2340,2655 r0 top
TP19 "PCB Test Point" TESTPOINT_1.2MM#1 2395,2150 r0 top
TP20 "PCB Test Point" TESTPOINT_1.2MM#1 2160,2470 r90 top
TP21 "PCB Test Point" TESTPOINT_1.2MM#3 2160,1700 r0 top
TP22 "PCB Test Point" TESTPOINT_1.2MM#3 2370,1870 r90 top
TP23 "PCB Test Point" TESTPOINT_1.2MM#1 2730,1280 r90 top
TP24 "PCB Test Point" TESTPOINT_1.2MM#1 975,1895 r90 top
TP25 "PCB Test Point" TESTPOINT_1.2MM#1 1770,2425 r90 top
TP26 "PCB Test Point" TESTPOINT_1.2MM#1 1335,2400 r90 top
TP27 "PCB Test Point" TESTPOINT_1.2MM#1 2335,1860 r90 top
TP28 "PCB Test Point" TESTPOINT_1.2MM#1 2235,1320 r90 top
TP29 "PCB Test Point" TESTPOINT_1.2MM#1 2035,1620 r90 top
TP30 "PCB Test Point" TESTPOINT_1.2MM#1 2660,1095 r90 top
TP31 "PCB Test Point" TESTPOINT_1.2MM#1 2580,1455 r0 top
TP32 "PCB Test Point" TESTPOINT_1.2MM#1 2520,1455 r90 top
U1 "OPA1664AIDR" SOIC-14 582,1200 r180 top
U1C "MCP2517FD" SOIC-14 1527.56,889.57 r90 top
U1R "RP2040" "QFN-56 RP2040" 1874.02,574.61 r180 top locked
U2 "OPA548F/500G3" "7-PIN TO-263" 442.97,3065 r180 top
U2C "CAN Transceiver" SOIC-8 1440.94,1362.01 r90 top
U2R "W25Q128JVSIQ" "SOIC-8 W25QxJV" 1996.12,228.15 r180 top
U3 "CDBC560-G" DO-214AB 1136,3312 r270 top
U4 "CDBC560-G" DO-214AB 1141,2837 r270 top
U5 "ZVN3310" SOT-23-3 871,3689 r0 top
U6 "THN 15-2425N" THN_15-2425N 2258,4850 r180 top
U7 "LM1117IMPX-3.3/NOPB" SOT-223-4 714,201 r180 top
U8 "AM1DS-0505DH30LPZ" AM1DS-0505DH30LPZ 1350,3395 r0 top
U9 "OPA604AU/2K5" SOIC-8 318.28,2220 r0 top
U10 "BU4S584G2-TR" FP-SSOP5-MFG 2095,1505 r90 bottom
U11 "Analog Switch SPST-NO" TSOT-23_S6 570,1650 r180 bottom
U12 "Analog Switch SPST-NO" TSOT-23_S6 1930,1720 r180 bottom
U13 "IC OPAMP GP 1 CIRCUIT 8SOIC" SOIC-8 1880,2725 r270 top
U14 "IC VOLTAGE FEEDBACK 2 CIRC 8SOIC" SOIC-8 1920,2055 r270 top
U15 "IC VOLTAGE FEEDBACK 2 CIRC 8SOIC" SOIC-8 1550,2055 r270 top
U16 "IC VOLTAGE FEEDBACK 2 CIRC 8SOIC" SOIC-8 1180,2055 r270 top
U17 "RF TXRX MOD BT PCB TH SMD" BM83SM1-00AA 2267.65,1777.09 r0 bottom
Y1R "CRYSTAL 12.0000MHZ 18PF SMD" "4-SMD, NO LEAD CRYSTAL 3.2x2.5mm" 1952.76,968.31 r180 top

## Footprints (in the part's own frame and the unit in brackets; to place one, negate y for a bottom-side part, rotate by r counter-clockwise, add the part's x,y. Pads: shape width x height; smd on the part's side, far side on the other; paste and mask are expansions set on the pad)
"4-SMD, NO LEAD CRYSTAL 3.2x2.5mm" [mm]
  rrect0% 1.4x1.1 smd: 1(0,0) 2(2.032,0) 3(2.032,1.778) 4(0,1.778)
  silkscreen extent -1.02,-1.2 3.05,2.92, body extent -0.58,-0.36 2.62,2.14, height 0.82
"7-PIN TO-263" [mm] "DDPAK-7, 8-Pads, Body 7.80x8.57mm (max), IPC Medium Density"
  rect 3.5x0.95 smd: 1(-6.3,3.81) 2(-6.3,2.54) 3(-6.3,1.27) 4(-6.3,0) 5(-6.3,-1.27) 6(-6.3,-2.54) 7(-6.3,-3.81)
  rect 8.8x10.5 smd: 8(3.65,0)
  silkscreen extent -6.43,-5.2 -1.15,5.2, body extent -7.45,-5.2 7.79,5.2, height 4.65
AM1DS-0505DH30LPZ [mil]
  rect 70x70 hole 50: 1(100,200)
  round 70 hole 50: 2(200,200) 3(400,200) 4(500,200) 5(600,200) 6(700,200)
  silkscreen extent 0,-10 800,250, body extent 15,0 785,240, height 400
BM83SM1-00AA [mm] "Bluetooth Bluetooth v5.0 Transceiver Module 2.4GHz ~ 2.48GHz PCB Trace Surface Mount"
  rrect50% 1.5x0.6 smd: 1(0.2,20.9) 2(0.2,19.9) 3(0.2,18.9) 4(0.2,17.9) 5(0.2,16.9) 6(0.2,15.9) 7(0.2,14.9) 8(0.2,13.9) 9(0.2,12.9) 10(0.2,11.9) 11(0.2,10.9) 12(0.2,9.9) 13(0.2,8.9) 14(0.2,7.9) 15(0.2,6.9) 16(0.2,5.9) 17(0.2,4.9) 18(0.2,3.9) 19(0.2,2.9) 20(0.2,1.9) 31(14.8,1.9) 32(14.8,2.9) 33(14.8,3.9) 34(14.8,4.9) 35(14.8,5.9) 36(14.8,6.9) 37(14.8,7.9) 38(14.8,8.9) 39(14.8,9.9) 40(14.8,10.9) 41(14.8,11.9) 42(14.8,12.9) 43(14.8,13.9) 44(14.8,14.9) 45(14.8,15.9) 46(14.8,16.9) 47(14.8,17.9) 48(14.8,18.9) 49(14.8,19.9) 50(14.8,20.9)
  rrect50% 0.6x1.5 smd: 21(3,0.2) 22(4,0.2) 23(5,0.2) 24(6,0.2) 25(7,0.2) 26(8,0.2) 27(9,0.2) 28(10,0.2) 29(11,0.2) 30(12,0.2)
  rect 1.78x1.78 smd: 51(12.3,10.4)
  rect 2.79x0.76 smd: 52(4.2,20.5)
  Keep-Out Layer board cut-out: -1,32.3 16.2,32.3 16.2,22.1 -1,22.1
  silkscreen extent -3.42,-1.2 2.9,32, body extent 0,0 15,32, height 2.5
CAP_EEHZC1J100P [mm]
  rect 3.2x1.6 smd: 1(-2.5,0) 2(2.5,0)
  silkscreen extent -4.25,-3.3 3.3,3.3, body extent -3.65,-3.3 3.65,3.3, height 5.8
CAPACITOR_0402 [mm]
  rect 0.56x0.6 smd: 1(-0.435,0) 2(0.435,0)
  silkscreen extent -1.02,-0.6 1.02,0.6, body extent -0.5,-0.28 0.5,0.27, height 0.51
CAPACITOR_0603 [mil] "CAPACITOR 0603"
  rect 30x40 smd: 1(-35,0) 2(35,0)
  silkscreen extent -60,-30 60,30, body extent -31,-16 32,16, height 31
CAPACITOR_1206 [mm]
  rect 1.2x1.82 smd: 1(-1.46,0) 2(1.46,0)
  silkscreen extent -0.54,-0.9 0.54,0.9, body extent -1.6,-0.9 1.6,0.9, height 1.61
"CAPACITOR_1206 - POLAR" [mil]
  rect 58.96x55 smd paste+0 mask+0: 1(-43.52,0) 2(43.52,0)
  silkscreen extent -44,-40 12,48, body extent -67,-36 67,36, height 73
CAPACITOR_1808 [mm] "Chip Capacitor, 2-Leads, Body 4.50x2.00mm, IPC Medium Density"
  rect 1.5x2.3 smd: 1(-2.05,0) 2(2.05,0)
  silkscreen extent -0.9,-1.05 0.9,1.05, body extent -2.45,-1.15 2.45,1.15, height 2.2
CAS-220TA [mm] "SWITCH SLIDE DPDT 100MA 6V"
  rrect0% 1x1.6 smd: 1(-1.75,-1.85) 2(0,-1.85) 3(1.75,-1.85) 4(-1.75,1.85) 5(0,1.85) 6(1.75,1.85)
  silkscreen extent -3.3,-2.1 2.7,2.1, body extent -2.7,-2.1 2.7,2.1, height 2.51
CONN_MINIUSB [mm] "USB2.0 Micro-B Receptacle SMD R/A"
  rrect50% 0.4x1.5 smd: 1(-1.3,2.675) 2(-0.65,2.675) 3(0,2.675) 4(0.65,2.675) 5(1.3,2.675)
  rrect50% 2.1x1.6 smd: 6(-3.1,2.55) 7(3.1,2.55)
  rrect50% 1.9x1.8 smd: 8(3.8,0) 9(-3.8,0)
  silkscreen extent -4.14,-1.96 4.11,3.75, body extent -3.96,-2.67 3.96,2.99, height 2.72
"CONN_MOLEX_MINIFIT JR_4 POS_R/A" [mm] "Molex Minifit Jr 5569 4 Pos R/A"
  round 3 hole 1.8: 1(2.1,7.3) 2(-2.1,7.3) 3(2.1,12.8) 4(-2.1,12.8)
  round 3 hole 3 unplated mask+0: ""(0,0)
  silkscreen extent -5.08,-6.73 5.08,6.73, body extent -4.8,-6.5 5.2,13.44, height 11.4
"CONN_MOLEX_MINIFIT JR_6 POS_R/A" [mm] "Molex Minifit Jr 5569 6 Pos R/A"
  round 3 hole 1.801: 1(8.4,7.3) 4(8.4,12.8)
  round 3 hole 1.8: 2(4.2,7.3) 3(0,7.3) 5(4.2,12.8) 6(0,12.8)
  round 3 hole 3 unplated mask+0: ""(0,0) ""(8.4,0)
  silkscreen extent -2.98,-6.86 11.38,6.73, body extent -2.58,-6.6 11.62,13.33, height 11.4
DO-214AB [mil]
  rect 98.43x126 smd paste+0 mask+0: 1(-129,0) 2(130,0)
  silkscreen extent -165,-128 240,128, body extent -160,-123 160,123, height 105
FP-0603-L_1_6_0_15-W_0_81-IPC_A [mil]
  rect 47.5x42.06 smd paste+0 mask+0: 1(-32.51,0) 2(32.51,0)
  silkscreen extent -56,-37 56,37, body extent -76,-41 76,41, height 10
FP-C0603C-CF-MFG [mm]
  rect 0.75x0.9 smd paste+0 mask+0: 1(-0.6,0) 2(0.6,0)
  silkscreen extent -0.87,-0.85 0.88,0.85, body extent -1.2,-0.6 1.2,0.6, height 0.25
FP-CRCW0603-e3-IPC_B [mil]
  rect 36.81x37.88 smd paste+0 mask+0: 1(-28.17,0) 2(28.17,0)
  silkscreen extent -30,-37 30,35, body extent -56,-29 56,29, height 10
FP-CRCW0603-e3-IPC_C [mil]
  rect 28.94x33.94 smd paste+0 mask+0: 1(-24.23,0) 2(24.23,0)
  silkscreen extent -30,-33 30,33, body extent -43,-23 43,23, height 10
FP-RMCF0603-IPC_A [mil]
  rect 47.48x41.66 smd paste+0 mask+0: 1(-31.54,0) 2(31.54,0)
  silkscreen extent -55,-37 55,37, body extent -75,-41 75,41, height 10
FP-SSOP5-MFG [mm]
  rect 1x0.6 smd paste+0 mask+0: 1(-1.2,0.95) 2(-1.2,0) 3(-1.2,-0.95) 4(1.2,-0.95) 5(1.2,0.95)
  silkscreen extent -2.5,-1.55 0.9,1.55, body extent -1.4,-1.45 1.4,1.45, height 1.25
INDUCTOR_0805 [mm]
  rrect25% 1x1.42 smd: 1(-0.935,0) 2(0.935,0)
  silkscreen extent -1.91,-1.14 1.91,1.14, body extent -1.11,-0.67 1.1,0.67, height 0.61
INDUCTOR_TCK078 [mm] "1.1 µH Unshielded Inductor 3.24 A 15mOhm Max Nonstandard"
  rect 2.15x5.5 smd: 1(0,0) 2(3.8,0)
  silkscreen extent -1.52,-3.05 5.33,3.05, body extent -1.25,-2.85 5.05,2.85, height 5.06
LED_0603 [mil] "LED 0603"
  rect 32x32 smd: 1(-35,0) 2(35,0)
  silkscreen extent -60,-25 60,25, body extent -31,-16 32,16, height 28
LED_0606_4SMD [mm]
  rrect0% 0.8x0.55 smd: 1(-0.8,-0.45) 2(-0.8,0.45) 3(0.8,0.45) 4(0.8,-0.45)
  silkscreen extent -1.22,-1.22 0.8,1.02, body extent -0.8,-0.8 0.8,0.8, height 0.35
"QFN-56 RP2040" [mm] "QFN, 56-Leads, Body 7.00x7.00mm, Pitch 0.40mm, Thermal Pad 3.10x3.10mm, IPC Medium Density"
  oval 0.875x0.2 smd: 1(-3.437,2.6) 2(-3.437,2.2) 3(-3.437,1.8) 4(-3.437,1.4) 5(-3.437,1) 6(-3.437,0.6) 7(-3.437,0.2) 8(-3.437,-0.2) 9(-3.437,-0.6) 10(-3.437,-1) 11(-3.437,-1.4) 12(-3.437,-1.8) 13(-3.437,-2.2) 14(-3.437,-2.6) 29(3.437,-2.6) 30(3.437,-2.2) 31(3.437,-1.8) 32(3.437,-1.4) 33(3.437,-1) 34(3.437,-0.6) 35(3.437,-0.2) 36(3.437,0.2) 37(3.437,0.6) 38(3.437,1) 39(3.437,1.4) 40(3.437,1.8) 41(3.437,2.2) 42(3.437,2.6)
  oval 0.2x0.875 smd: 15(-2.6,-3.437) 16(-2.2,-3.437) 17(-1.8,-3.437) 18(-1.4,-3.437) 19(-1,-3.437) 20(-0.6,-3.437) 21(-0.2,-3.437) 22(0.2,-3.437) 23(0.6,-3.437) 24(1,-3.437) 25(1.4,-3.437) 26(1.8,-3.437) 27(2.2,-3.437) 28(2.6,-3.437) 43(2.6,3.437) 44(2.2,3.437) 45(1.8,3.437) 46(1.4,3.437) 47(1,3.437) 48(0.6,3.437) 49(0.2,3.437) 50(-0.2,3.437) 51(-0.6,3.437) 52(-1,3.437) 53(-1.4,3.437) 54(-1.8,3.437) 55(-2.2,3.437) 56(-2.6,3.437)
  rect 3.2x3.2 smd: 57(0,0)
  silkscreen extent -4.19,-3.65 3.65,3.65, body extent -3.52,-3.52 3.52,3.52, height 0.85
RESC1608X55X25LL10T15 [mm] "Chip Resistor, 2-Leads, Body 1.60x0.80mm, IPC High Density"
  rect 0.6x0.8 smd: 1(-0.65,0) 2(0.65,0)
  body extent -0.85,-0.45 0.85,0.45, height 0.55
RESC1608X55X25ML10T15 [mm] "Chip Resistor, 2-Leads, Body 1.60x0.80mm, IPC Low Density"
  rect 0.8x1 smd: 1(-0.75,0) 2(0.75,0)
  body extent -0.85,-0.45 0.85,0.45, height 0.55
RESC1608X55X30LL15T15 [mm] "Chip Resistor, 2-Leads, Body 1.60x0.80mm, IPC High Density"
  rect 0.7x0.85 smd: 1(-0.625,0) 2(0.625,0)
  body extent -0.87,-0.48 0.87,0.48, height 0.55
RESC1608X55X30ML15T15 [mm] "Chip Resistor, 2-Leads, Body 1.60x0.80mm, IPC Low Density"
  rect 0.9x1.05 smd: 1(-0.725,0) 2(0.725,0)
  body extent -0.87,-0.48 0.87,0.48, height 0.55
RESC1608X55X30NL15T15 [mm] "Chip Resistor, 2-Leads, Body 1.60x0.80mm, IPC Medium Density"
  rect 0.8x0.95 smd: 1(-0.675,0) 2(0.675,0)
  body extent -0.87,-0.48 0.87,0.48, height 0.55
RESC1609X50X30ML10T20 [mm] "Chip Resistor, 2-Leads, Body 1.55x0.85mm, IPC Low Density"
  rect 0.9x1.05 smd: 1(-0.675,0) 2(0.675,0)
  body extent -0.82,-0.48 0.82,0.48, height 0.5
RESC1609X50X30NL10T20 [mm] "Chip Resistor, 2-Leads, Body 1.55x0.85mm, IPC Medium Density"
  rect 0.8x0.95 smd: 1(-0.625,0) 2(0.625,0)
  body extent -0.82,-0.48 0.82,0.48, height 0.5
RESISTOR_0402 [mm] "Resistor 0402"
  rect 0.55x0.75 smd: 1(-0.475,0) 2(0.475,0)
  silkscreen extent -1.02,-0.64 1.02,0.64, body extent -0.5,-0.25 0.5,0.25, height 0.25
RESISTOR_0603 [mil] "Resistor 0603"
  rect 40x45 smd: 1(-33.5,0) 2(33.5,0)
  silkscreen extent -65,-35 65,35, body extent -31,-16 32,16, height 16
RESISTOR_1206 [mil]
  rect 41.66x67.41 smd paste+0 mask+0: 1(-56.18,0) 2(56.18,0)
  silkscreen extent -24,-34 24,34, body extent -61,-31 61,31, height 26
SMD_434123025826 [mm]
  rect 1.05x0.65 smd: A1(-2.075,1.075) A2(2.075,1.075) B1(-2.075,-1.075) B2(2.075,-1.075)
  silkscreen extent -2.1,-1.6 2.1,1.6, body extent -2.3,-1.6 2.3,1.6, height 2.5
SOIC-8 [mm] "SOIC, 8-Leads, Body 4.90x3.90mm, Pitch 1.27mm, IPC Medium Density"
  oval 1.45x0.6 smd: 1(-2.725,1.905) 2(-2.725,0.635) 3(-2.725,-0.635) 4(-2.725,-1.905) 5(2.725,-1.905) 6(2.725,-0.635) 7(2.725,0.635) 8(2.725,1.905)
  silkscreen extent -2.85,-2.5 1.6,2.88, body extent -3,-2.5 3,2.5, height 1.75
"SOIC-8 W25QxJV" [mm] "SOIC, 8-Leads, Body 5.28x5.28mm, Pitch 1.27mm, IPC Medium Density"
  oval 1.7x0.6 smd: 1(-3.55,1.905) 2(-3.55,0.635) 3(-3.55,-0.635) 4(-3.55,-1.905) 5(3.55,-1.905) 6(3.55,-0.635) 7(3.55,0.635) 8(3.55,1.905)
  silkscreen extent -3.68,-2.7 2.3,2.88, body extent -3.95,-2.62 3.95,2.62, height 1.95
SOIC-14 [mm] "SOIC, 14-Leads, Body 8.65x3.90mm, Pitch 1.27mm, IPC Medium Density"
  oval 1.45x0.6 smd: 1(-2.725,3.81) 2(-2.725,2.54) 3(-2.725,1.27) 4(-2.725,0) 5(-2.725,-1.27) 6(-2.725,-2.54) 7(-2.725,-3.81) 8(2.725,-3.81) 9(2.725,-2.54) 10(2.725,-1.27) 11(2.725,0) 12(2.725,1.27) 13(2.725,2.54) 14(2.725,3.81)
  silkscreen extent -2.85,-4.35 1.6,4.78, body extent -3,-4.4 3,4.4, height 1.7
"SOT 23-6L" [mm] "SOT23, 6-Leads, Body 2.95x2.80mm, Pitch 0.95mm, IPC Medium Density"
  rect 0.95x0.6 smd: 1(-1.35,0.95) 2(-1.35,0) 3(-1.35,-0.95) 4(1.35,-0.95) 5(1.35,0) 6(1.35,0.95)
  silkscreen extent -1.47,-1.55 0.5,1.93, body extent -1.4,-1.55 1.4,1.55, height 1.45
SOT-23-3 [mil]
  rect 22x50 smd paste+0 mask+4: 1(-37.5,-41) 2(37.5,-41) 3(0,41)
  silkscreen extent -65,-33 65,33, body extent -60,-52 60,52, height 44
SOT-223-4 [mm]
  rect 2.05x1 smd paste+0 mask+0.102: 1(-3.175,2.3) 2(-3.175,0) 3(-3.175,-2.3)
  rect 2.05x3.25 smd paste+0 mask+0.102: 4(3.175,0)
  silkscreen extent -1.96,-3.35 1.3,3.35, body extent -3.5,-3.25 3.5,3.25, height 1.68
TC2030-MCP [mil]
  round 31 smd: 1(50,-25) 2(50,25) 3(100,-25) 4(100,25) 5(150,-25) 6(150,25)
  round 34 hole 35 unplated: A(0,0) B(200,40) C(200,-40)
  round 92 hole 93 unplated: D(0,-100) E(125,-100) F(0,100) G(125,100)
  silkscreen extent -55,-155 225,155
TESTPOINT_1.2MM#1 [mm]
  round 1.2 smd: TP(0,0)
TESTPOINT_1.2MM#2 [mm]
  round 1.2 smd: TP(4.699,0)
TESTPOINT_1.2MM#3 [mm]
  round 1.2 smd far side: TP(0,0)
TESTPOINT_1.2MM#4 [mm]
  round 1.2 smd: TP(4.445,-4.318)
THN_15-2425N [mil]
  round 60 hole 30 mask-99999: 1(500,0)
  round 60 hole 30: 2(300,0) 3(800,800) 4(400,800) 5(0,800) 6(0,0)
  silkscreen extent -110,-110 910,910, body extent -100,-100 900,900, height 392
TRIM_TC33X-2-203E [mm]
  rect 1.2x1.2 smd: 1(-1.8,1) 3(-1.8,-1)
  rect 1.5x1.6 smd: 2(1.45,0)
  silkscreen extent -3.07,-1.8 1.8,1.8, body extent -1.9,-1.5 1.9,1.5, height 1.1
TSOT-23_S6 [mil]
  rect 48x20 smd: 1(-45,37.4) 2(-45,0) 3(-45,-37.4) 4(45,-37.4) 5(45,0) 6(45,37.4)
  silkscreen extent -69,-62 40,65, body extent -55,-57 55,57, height 39

## Part data
C1 C2 C3 C4 C5 C6 C7 C10 C11 C12: library part CMP-2006-03384-2, "CAP CER 1000PF 25V 1% NP0 0603", Capacitance="1,000 pF", Manufacturer=KEMET, Manufacturer Part Number=C0603C102F3GACTU, Package=C0603C-CF, Temperature="-55°C to +125°C", Temperature Characteristic=C0G, Temperature Coefficient=30ppm/°C, Temperature Range High=+125°C, Temperature Range Low=-55°C, Tolerance=0.01, Voltage Rating="25 V", Automotive=Yes, Automotive Grade="Grade 1", Category=Cap, ComponentLink2Description=Datasheet, ComponentLink2URL=https://api.kemet.com/component-edge/download/datasheet/C0603C100J5GACAUTO.pdf, Device Class L1="Passive Components", Device Class L2=Capacitors, Device Class L3="Ceramic Capacitors", Digikey Description="CAP CER 1000PF 25V 1% NP0 0603", Height=0.87mm, Lead Free=Yes, Material=Ceramic, Mouser Description="Capacitor, Ceramic, 1Nf, 25Vdc, 1-% Tol, 1+% Tol, C0g-Tc Code, -30, 30Ppm-Tc", Octopart=https://octopart.com/c0603c102f3gactu-kemet-9143726, RoHS=TRUE
C1C C3C C3R C4C C5R C6R C7R C8R C9R C10R C12R C13R: library part CAPACITOR_0.1uF_0402, "Cap 100nF 25V +/-10% / Ceramic 0402", Supplier Part Number 1=478-7868-1-ND, Tolerance="+/- 10%", Voltage=25V, Made By="Robert Pafford", Supplier 1=Digi-Key
C1R C2R: library part CAPACITOR_0.000027uF_0402, "Cap 27pF 50V +/-5% / Ceramic 0402", Supplier Part Number 1=445-5589-1-ND, Tolerance="+/- 5%", Voltage=50V, Made By="Robert Pafford", Supplier 1=Digi-Key
C2C: library part CAPACITOR_0.0047uF_0402, "4700 pF +/-10% 25V Ceramic Capacitor X7R 0402", Supplier Part Number 1=478-6195-1-ND, Tolerance="+/- 10%", Voltage=25V, Made By="Robert Pafford", Supplier 1=Digi-Key
C4R C5C C11R: library part CAPACITOR_1uF_0402, "Cap 1uF 16V +/-10% / Ceramic 0402", Supplier Part Number 1=478-0402YD105KAT4ADKR-ND, Tolerance="+/- 10%", Voltage=16V, Made By="Robert Pafford", Supplier 1=Digi-Key
C8 C9 C14 C16: library part CAPACITOR_0.1uF_0603_25V, "Cap 100nF 25V +/-10% / Ceramic 0603", Supplier Part Number 1=1276-1006-1-ND, Tolerance="+/- 10%", Voltage=6.3V, ComponentLink1Description=Datsheet, ComponentLink1URL=https://www.mouser.com/datasheet/2/212/KEM_C1002_X7R_SMD-1102033.pdf, Made By="Flip B", Supplier 1=Digikey
C13: library part CAPACITOR_1uF_0603, "Cap 1uF 16V +/-10% / Ceramic 0603", Supplier Part Number 1=C1608X7R1C105K080AC, Tolerance="+/- 10%", Voltage=16V, Made By="Flip B", Supplier 1="Arrow Electronics"
C15: library part CAPACITOR_0.01uF_0603_50V, "10000 pF ±10% 50V Ceramic Capacitor X7R 0603 (1608 Metric)", Tolerance="+/- 10%", Voltage=6.3V, ComponentLink1Description=Datsheet, ComponentLink1URL=https://www.mouser.com/datasheet/2/212/KEM_C1002_X7R_SMD-1102033.pdf, Made By="Flip B", Supplier 1="Arrow Electronics", Supplier Part Number 1=CL10B103KB8NNNC
C17 C18: library part "CAP ALUM 10UF 20% 63V SMD", "10 µF 63 V Aluminum - Polymer Capacitors Radial, Can SMD 120mOhm", Max Voltage=63V, Supplier Part Number 1=P15466CT-ND, Tolerance="+/- 20%", Made By="Robert Pafford", Supplier 1=Digi-Key
C19 C20: library part CAPACITOR_10uF_1206_Tantalum_1, "Cap 10uF 16V +/-20% / Tantalum 1206", Supplier Part Number 1=26AC4143, Tolerance="+/- 10%", Value (uF)="10 uF", Voltage=16V, ComponentLink1Description=Digikey, ComponentLink1URL=https://www.digikey.com/en/products/detail/kyocera-avx/F981A106MMA/4004990, Made By="Dylan T", Supplier 1=Newark
C21 C23: library part "CAP CER 10UF 16V X6S 0603", "10 µF ±20% 16V Ceramic Capacitor X6S 0603 (1608 Metric)"
C22 C45: library part CAPACITOR_4.7uF_0603, "Cap 4.7uF 6.3V +/-10% / Ceramic 0603", Supplier Part Number 1=1276-2087-1-ND, Tolerance="+/- 10%", Voltage=6.3V, Made By="Robert Pafford", Supplier 1=Digi-Key
C24 C25 C26 C30 C31 C32 C36 C37 C38 C39 C40: library part CAPACITOR_0.1uF_0603, "Cap 100nF 6.3V +/-10% / Ceramic 0603", Supplier Part Number 1=399-15351-1-ND, Tolerance="+/- 10%", Voltage=6.3V, ComponentLink1Description=Datsheet, ComponentLink1URL=https://www.mouser.com/datasheet/2/212/KEM_C1002_X7R_SMD-1102033.pdf, Made By="Flip B", Supplier 1=Digi-Key
C27 C28 C29 C33 C34 C35: library part CMP-2006-04378-2, "General Purpose Ceramic Capacitor, 0603, 1nF, 10%, X7R, 15%, 50V", Capacitance=1nF, Case Code (Imperial)=0603, Case Code (Metric)=1608, Dielectric=X7R, Dielectric Material=Ceramic, Max Operating Temperature=125°C, Min Operating Temperature=-55°C, Package Quantity=4000, Tolerance=10%, Voltage=50V, Case/Package=0603, Construction=Flat, Contact Plating=Tin, Depth=0.81mm, Height=0.9mm, Lead Free="Lead Free", Length=1.6mm, Mount="Surface Mount", Number of Pins=2, Packaging="Tape and Reel", Radiation Hardening=No, REACH SVHC="No SVHC", RoHS Compliant=Yes, Series=-, Termination=SMD/SMT, Thickness=0.035inch, Voltage Rating=50V, Voltage Rating (DC)=50V, Weight=7.1E-05oz, Width=0.032inch
C41 C42: library part "4.7u Auto Grade Capacitor,1206,X7R,50", "4.7 µF ±10% 50V Ceramic Capacitor X7R 1206 (3216 Metric)"
C43 C44: library part "CAP CER 680PF 3KV X7R 1808", "CAP CER 680PF 3KV X7R 1808"
D1: library part LED_Red_0603, "LED Red Vf= 2V If = 0.020A / 150060RS75000", Color=Red, Forward Current=20mA, Forward Voltage=2V, Package=0603, Supplier Part Number 1=732-4978-1-ND, Made By="Robert Pafford", Supplier 1=Digi-Key
D1C: library part LED_RGB_4SMD, "LED RGB CLEAR 4SMD", Blue Forward Current=5mA, Blue Forward Voltage=2.8V, Color=RGB, Package=4-SMD, Red Forward Voltage=1.8V, Supplier Part Number 1=1080-1552-1-ND, ComponentLink1Description=Datasheet, ComponentLink1URL=https://everlightamericas.com/index.php?controller=attachment&id_attachment=3220, Green Forward Current=5mA, Green Forward Voltage=2.8V, Made By="Robert Pafford", Red Forward Current=5mA, Supplier 1=Digi-Key